# Altium PCB DB31.PcbDoc (part 8 of 8)
Units mil, origin at the board's own origin, x right, y up, seen from the top; angles counter-clockwise.
Board outline 3236.22 x 4456.69 mil, 8 copper layers (Top Layer, MidLayer1, MidLayer2, GND-Layer5, MidLayer3, VCC, MidLayer4, Bottom Layer), stack 61.8 mil thick; 226 components, 469 nets, 1815 pads, 1562 vias.
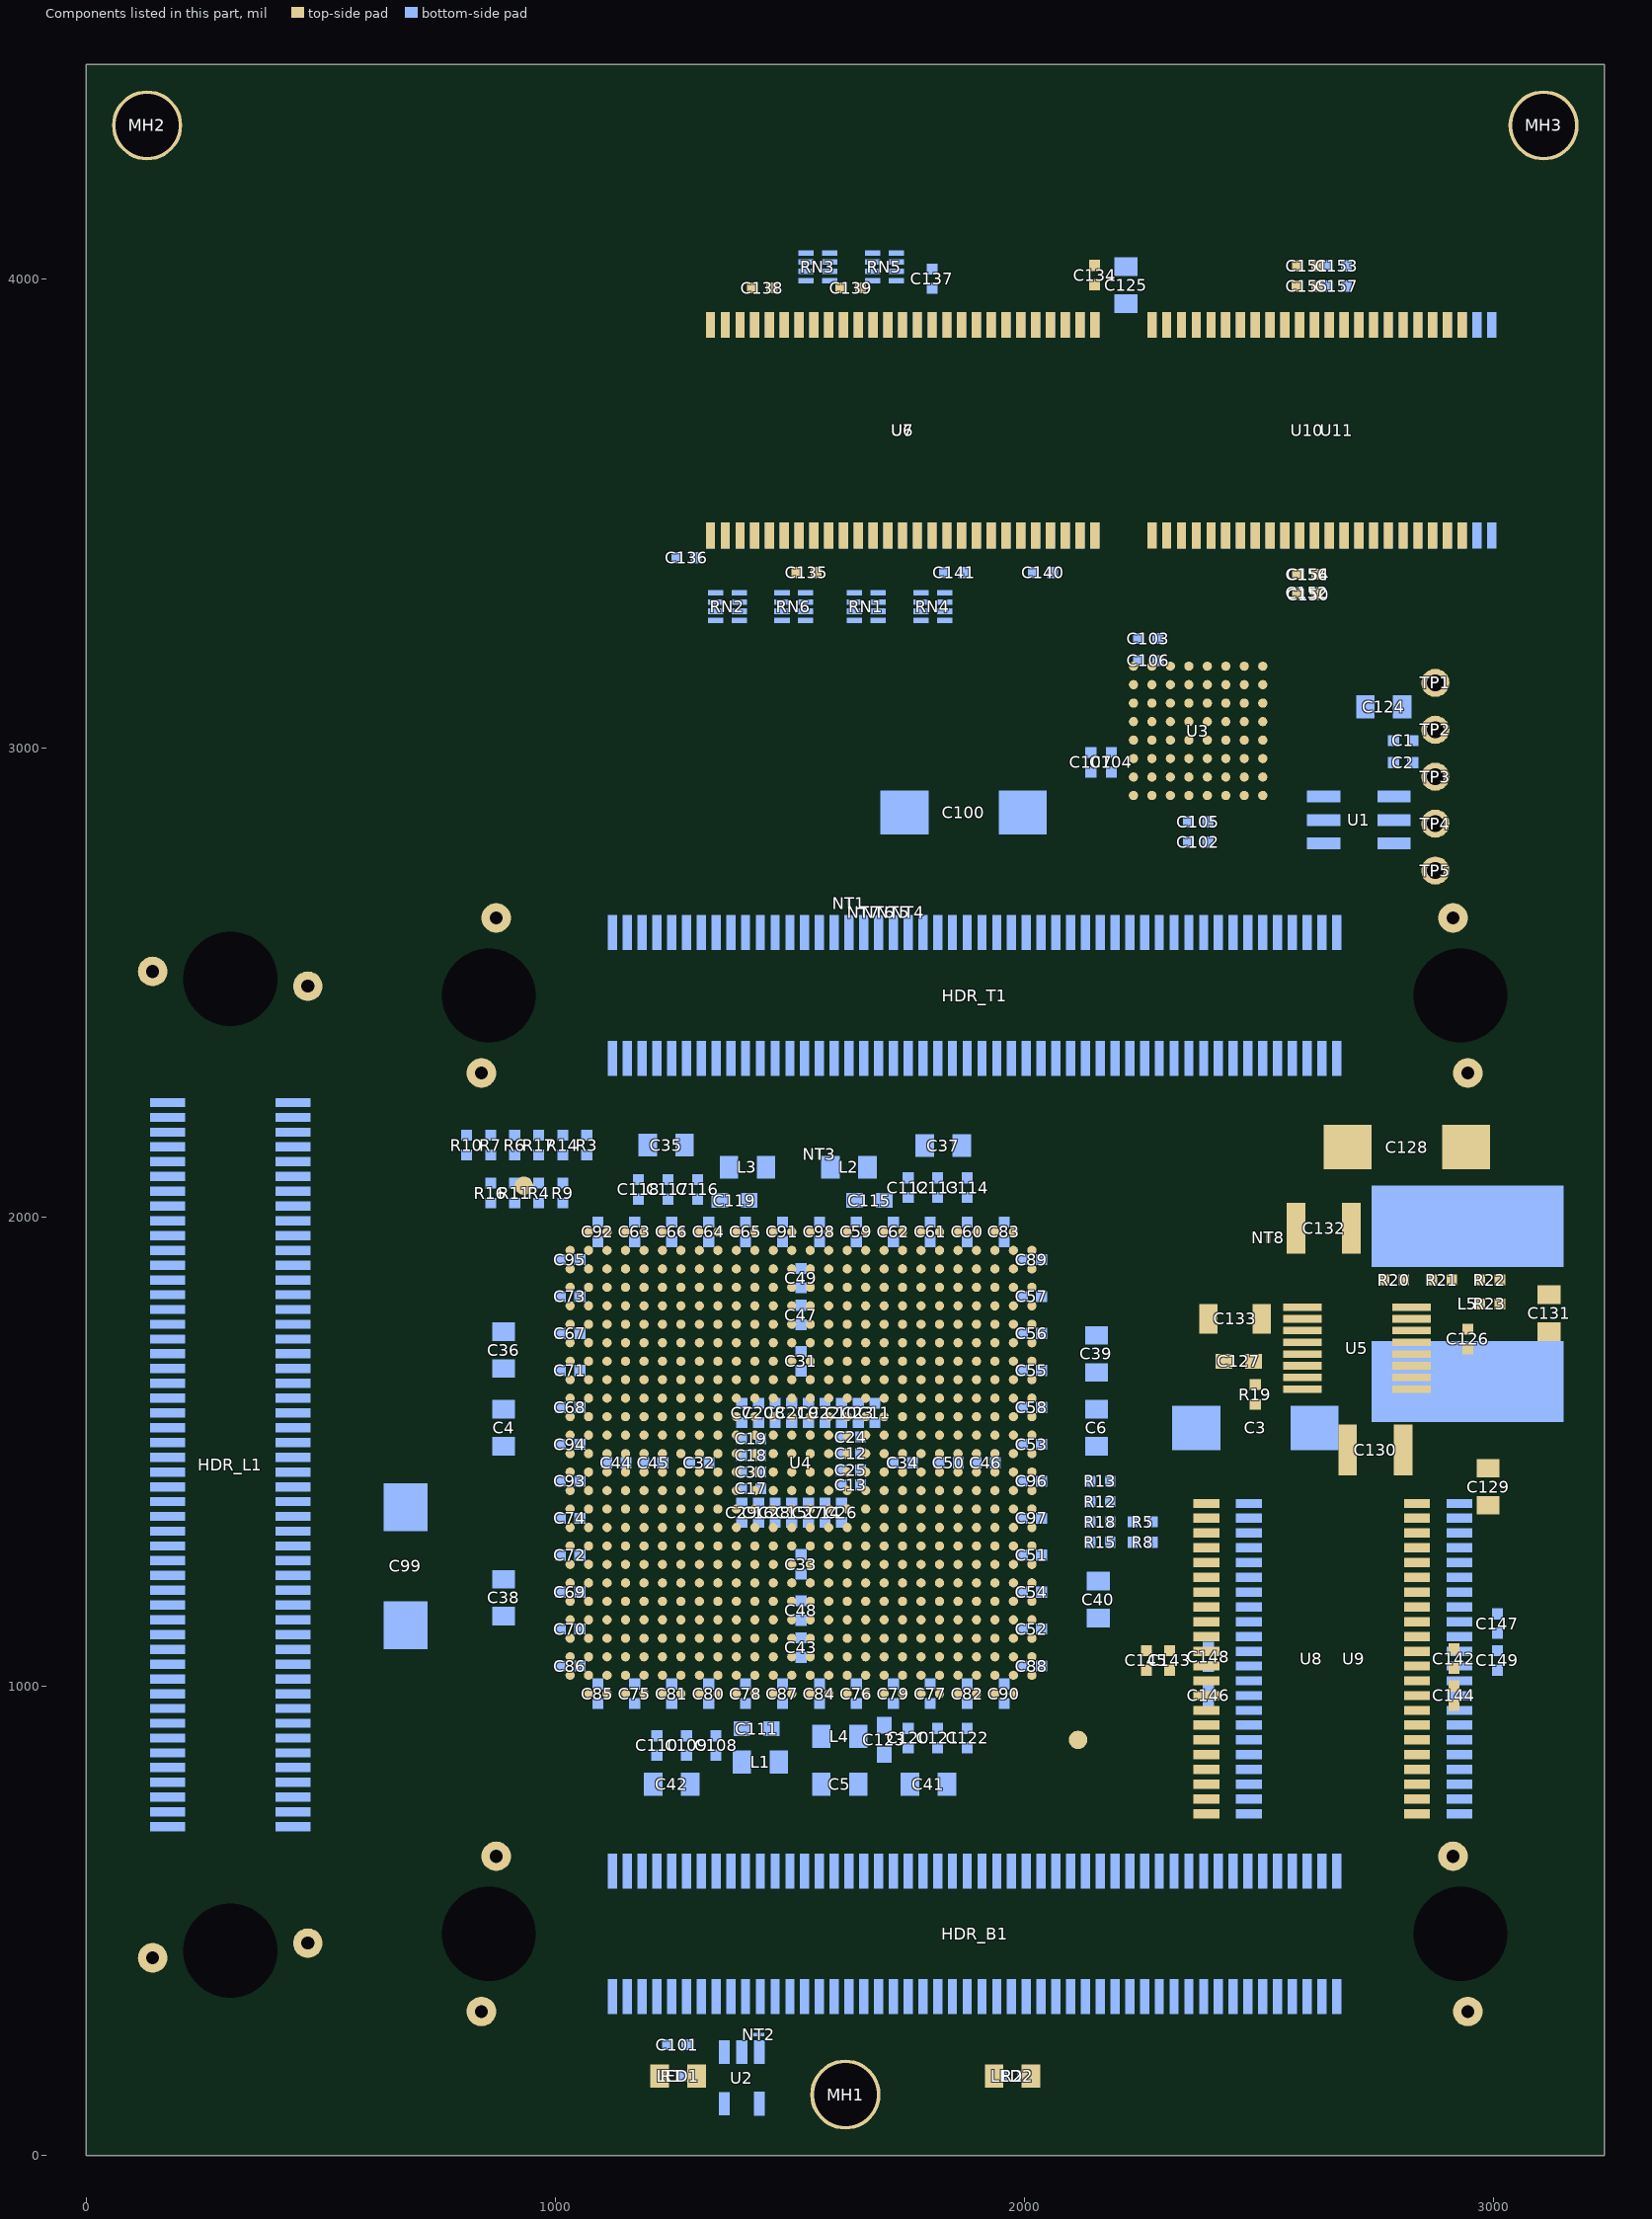
[diagram p14: the components of this part, seen from the top]

## Silkscreen, mask and mechanical layers (free items; w line width, h text height)
Top Overlay:
  region: 146.51,4136.09 139.44,4129.02 164.19,4104.27 171.26,4111.34
  rectangle: 136.51,4026.09 146.51,4136.09
  region: 88.59,4111.34 95.66,4104.27 120.41,4129.02 113.34,4136.09
  region: 123.34,4136.09 113.34,4136.09 113.34,4026.09 123.34,4026.09
  region: 3122.89,4136.09 3115.82,4129.02 3140.56,4104.27 3147.64,4111.34
  rectangle: 3112.89,4026.09 3122.89,4136.09
  region: 3064.97,4111.34 3072.04,4104.27 3096.79,4129.02 3089.71,4136.09
  region: 3099.71,4136.09 3089.71,4136.09 3089.71,4026.09 3099.71,4026.09
  region: 1814.46,159.54 1814.46,169.54 1779.46,169.54 1779.46,159.54
  region: 1772.38,166.61 1779.46,159.54 1857.24,237.33 1850.17,244.4
  rectangle: 1756,183 1766,218
  region: 1840.85,253.71 1833.78,260.78 1756,183 1763.07,175.93
  region: 2787.4,695.23 2787.4,1424.21 2694.88,1424.21 2694.88,695.23
  rectangle: 1337.26,129.92 1351.38,208.66
  rectangle: 2049.67,129.92 2063.98,208.66
  rectangle: 1301.18,3503.94 2179.13,3596.46
  rectangle: 2238.19,3502.95 2966.89,3595.47
  region: 1073.79,617.74 998.77,617.74 998.77,318.48 1073.79,318.48
  rectangle: 2715.79,318.48 2788.79,617.48
  rectangle: 998.77,318.48 1627.79,354.48
  rectangle: 998.77,581.74 1627.79,617.74
  region: 1579.72,4181.1 1579.72,4456.69 1576.77,4456.69 1576.77,4181.1
  region: 1664.37,4181.1 1664.37,4456.69 1649.61,4456.69 1649.61,4181.1
  region: 1640.75,4181.1 1640.75,4456.69 1628.94,4456.69 1628.94,4181.1
  region: 1618.11,4181.1 1618.11,4456.69 1610.24,4456.69 1610.24,4181.1
  region: 1598.43,4181.1 1598.43,4456.69 1593.51,4456.69 1593.51,4181.1
  region: 1689.96,4181.1 1689.96,4456.69 1670.28,4456.69 1670.28,4181.1
  region: 2984.25,4181.1 2984.25,4213.58 1693.9,4213.58 1693.9,4181.1
  region: 2968.5,4438.98 2968.5,4456.69 1693.9,4456.69 1693.9,4438.98
  region: 1803.15,4447.83 1693.9,4447.83 1693.9,4181.1 1803.15,4181.1
  region: 1699.8,4318.9 1699.8,4199.8 1968.5,4199.8 1968.5,4318.9
  rectangle: 2925.2,4181.1 2980.31,4456.69
  rectangle: 2980.31,4181.1 3232.28,4200.79
  rectangle: 2755.91,4204.72 2980.31,4318.9
  rectangle: 2736.22,1620.75 2763.78,1820.75
  lines w3: 1118.09,192.91 1133.09,202.91 1123.09,202.91 1143.09,217.91 ; 1133.09,207.91 1143.09,217.91 ; 1133.09,212.91 1143.09,217.91 ; 2137.52,187.01 2152.52,197.01 2142.52,197.01 2162.52,212.01 ; 2152.52,202.01 2162.52,212.01 ; 2152.52,207.01 2162.52,212.01
  lines w5: 1078.13,171.78 1103.06,171.78 ; 1103.06,173.36 1126.68,173.36 ; 1104.64,163.12 1126.68,172.05 ; 1104.64,180.97 1126.68,172.05 ; 1105.03,168.63 1126.68,172.96 ; 1105.03,175.46 1126.68,171.13 ; 1126.68,156.3 1126.68,187.79 ; 1126.68,171.78 1150.04,171.78 ; 2097.56,165.88 2122.48,165.88 ; 2122.48,167.45 2146.1,167.45 ; 2124.06,157.21 2146.1,166.14 ; 2124.06,175.07 2146.1,166.14 ; 2124.45,162.73 2146.1,167.06 ; 2124.45,169.56 2146.1,165.23 ; 2146.1,150.39 2146.1,181.89 ; 2146.1,165.88 2169.46,165.88 ; 2260.08,1094.39 2280.3,1122.24 ; 2288.68,987.98 2308.9,1015.83 ; 1126.68,172.05 1103.06,187.79 1103.06,156.3 1126.68,172.05 ; 2146.1,166.14 2122.48,150.39 2122.48,181.89 2146.1,166.14
  lines w7.87: 3232.28,4185.04 3232.28,4200.79 ; 3232.28,4200.79 3232.28,4452.76 2980.31,4452.76 2980.31,4200.79 3232.28,4200.79
  text "Altera®  Cyclone™ II" at 1807.26,4342.52 h125.98
  text "EP2C35F672C8" at 1980.49,4216.54 h118.11
  text "SRAM-256Kx16" at 2345.44,3699.95 h50
  text "DRAM-16Mx16" at 1482.53,3682.61 h50
  text "FLASH" at 2491.1,2767.2 h34
  text "1831" at 2721.4,1671.7 h40 r90
  text "SRAM-256Kx16" at 2589.13,807.8 h50 r90
  text "DB31.07" at 1027.8,488.46 h98.43
  text "EP2C35F672C8" at 1027.8,430.47 h60
  text "Altera Daughter Board" at 1028.31,354.49 h60
  text "DB31.07" at 1625.79,318.46 h60
  text "PROGRAM" at 1145,60 h55.12
  text "POWER" at 1895,60 h55.12
Bottom Overlay:
  drawing of 1221 lines, arcs and shapes, not listed
  text "Altera®  Cyclone™ II" at 2905.38,4344.42 h125.98
  text "EP2C35F672C8" at 2732.16,4218.44 h118.11
  text "MANUFACTURE" at 1006.78,3830.86 h40
  text "DATE" at 1007.88,3764.06 h40
  text "SRAM-256Kx16" at 2940.57,3704.01 h50
  text "DRAM-16Mx16" at 1997.78,3682.61 h50
  text "COMPLIANCE:" at 1182.36,3081.45 h45
  text "CLASS 2" at 432.36,2991.45 h40
  text "IPC-A-600H" at 1092.36,2991.45 h40
  text "CLASS 2" at 432.36,2911.45 h40
  text "TYPE 3" at 682.36,2911.45 h40
  text "IPC-6012D" at 1092.36,2911.45 h40
  text "DS2406" at 2711.2,2774.8 h28 r270
  text "1" at 116.93,2272.44 h40
  text "SRAM-256Kx16" at 2733.32,788.17 h50 r270
  text "1" at 1070.87,255.91 h40
  text "DB31" at 412.16,123.67 h120
Bottom Solder:
  region: 2455.79,1920.32 2455.79,2040.32 2305.79,2040.32 2305.79,1920.32
PCB Boundary:
  lines w3.94: 1523.62,4456.69 3236.22,4456.69 ; 1523.62,4456.69 3236.22,4456.69 ; 1523.62,4456.69 0,4456.69 0,0 1618.11,0 3236.22,0 3236.22,4456.69 ; 1523.62,4456.69 3236.22,4456.69 ; 1523.62,4456.69 3236.22,4456.69
Mechanical 7:
  lines w7.87: 2425.71,1720.19 2249.13,1847.52 2249.13,2044.37 2425.71,2171.7 ; 2499.41,1746.69 2322.83,1874.02 2322.83,2070.87 2499.41,2198.19 ; 2575.91,1945.94 2654.65,1945.94 ; 2615.28,1906.57 2615.28,1985.32 ; 2649.61,1972.44 2728.35,1972.44 ; 2688.98,1933.07 2688.98,2011.81 ; 2808.78,1720.19 2985.35,1847.52 2985.35,2044.37 2808.78,2171.7 ; 2882.48,1746.69 3059.06,1874.02 3059.06,2070.87 2882.48,2198.19
Keep Away From Edge:
  lines w7.87: 200,200 3030,200 3030,4250 200,4250 200,200

## Dimensions
307.09,437.01 to 858.27,472.44 on Dimensions
2929.13,472.44 to 2929.13,2472.44 on Dimensions
3106.3,4326.77 to 3236.22,0 on Dimensions
129.92,4342.52 to 0,15.75 on Dimensions
307.09,-15.75 to 0,4275.59 on Dimensions
3236.22,0 to 0,4059.06 on Dimensions
0,4456.69 to -19.69,0 on Dimensions
2929.14,472.44 to 3236.22,-3.94 on Dimensions
1618.11,129.92 to 3236.22,19.69 on Dimensions
307.09,437.01 to -19.69,0 on Dimensions
1618.11,129.92 to 3244.09,0 on Dimensions
2929.14,472.44 to 3244.09,0 on Dimensions
2865.92,4456.69 to 3106.3,4326.77 on Dimensions

## Text inside footprints (layer, text, board x,y; h text height)
PBFREE: Bottom Overlay "Pb" at 377.32,3566.89 h120